# Altium PCB iMX6 Rex Development Baseboard V1I1_PCB.PcbDoc (part 6 of 6)
Units mm, origin at the board's own origin, x right, y up, seen from the top; angles counter-clockwise.
Board outline 135 x 110 mm, 6 copper layers (L1, L2, L3, L4 (PWR), L5, L6), stack 1.542 mm thick; 580 components, 458 nets, 2100 pads, 1201 vias.
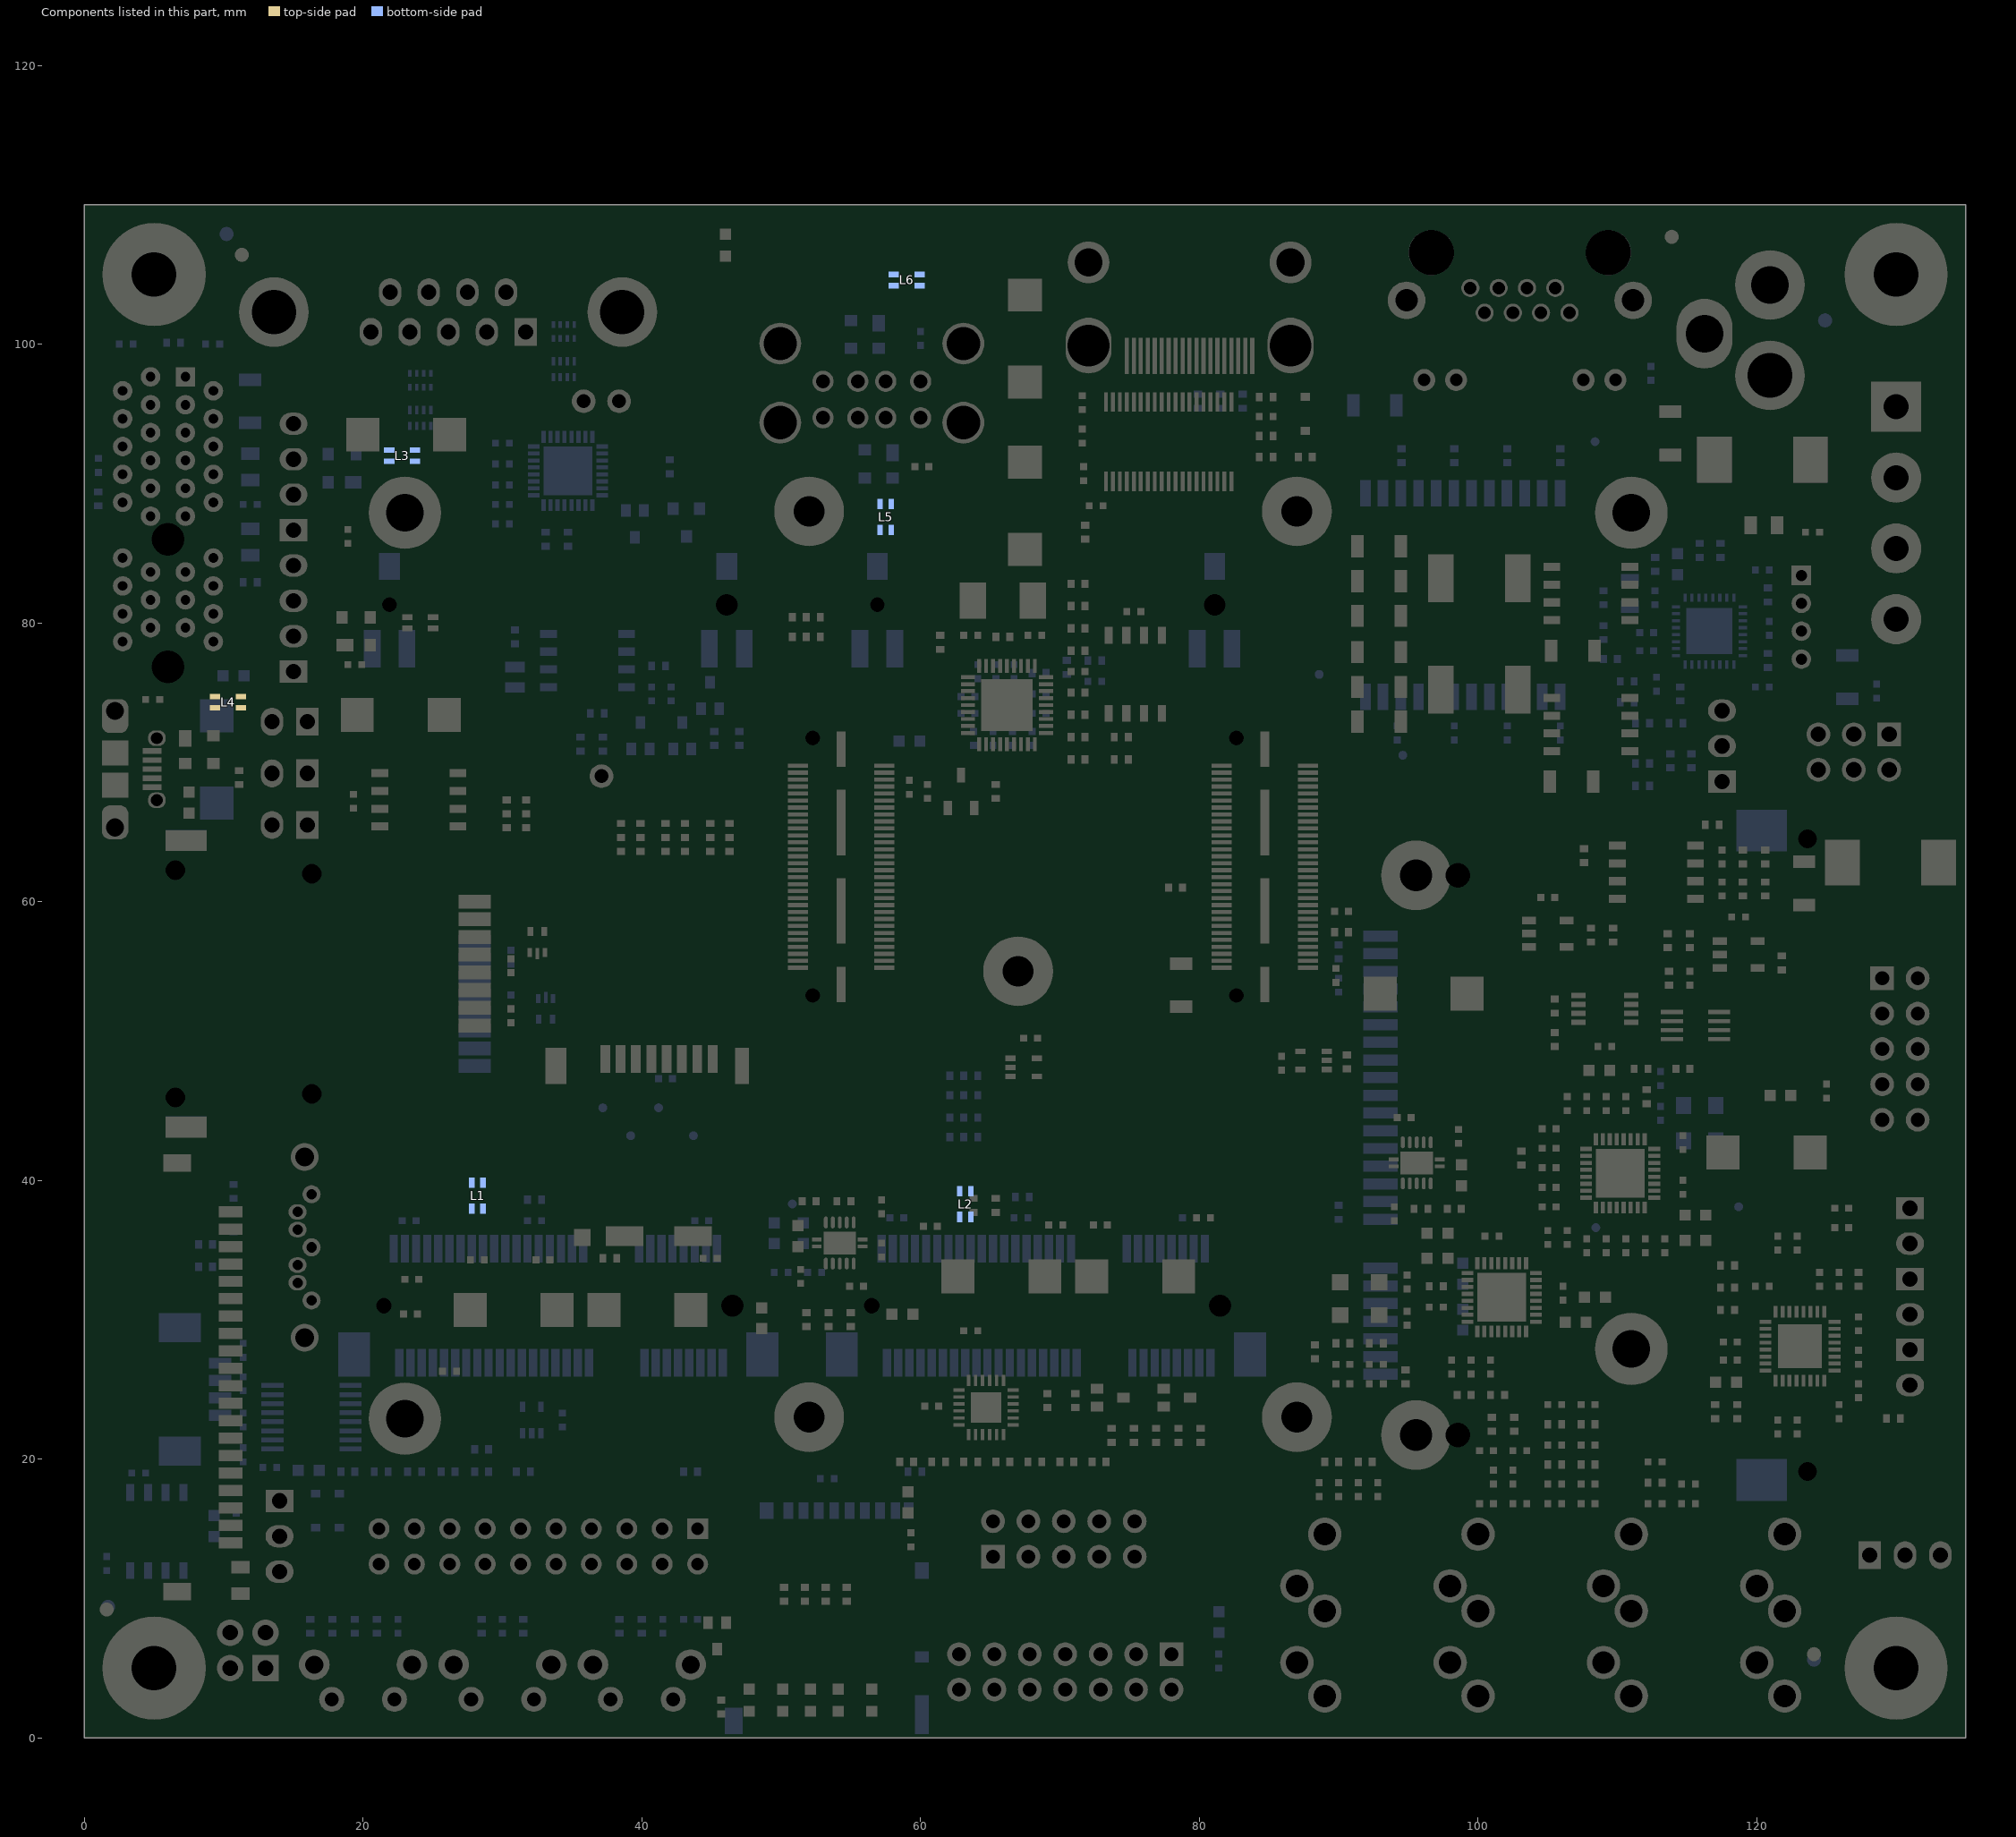
[diagram p10: the components of this part, seen from the top]

## Polygon pours and split planes (outlines as drawn) (continued)
GND on L6 "L6-No Net" (solid, pour order 292): 44.2,76.8 45.5,76.8 46,77.2 46,79.1 45.6,79.5 44.2,79.5
GND on L6 "L6-No Net" (solid, pour order 294): 46.7,79.5 48.3,79.5 48.7,79.1 48.7,77.2 48.3,76.8 46.7,76.8
GND on L6 "L6-No Net" (solid, pour order 306): 45.9,0.3 47.5,0.3 47.9,0.7 47.9,1.2 47.9,1.6 47.3,2.2 46,2.2 45.9,2.2 45.6,1.9 45.3,1.6 45.3,0.8 45.3,0.7 45.4,0.6 45.7,0.3 45.9,0.3
+5V_VCC1 on L6 "L6-No Net" (solid, pour order 224): 17 vertices, not listed, extent 107.9,68 111.6,79.1
GND on L6 "L6-No Net" (solid, pour order 303): 5.6,65.16 5.3,64.86 5.3,63.86 5.6,63.56 8.8,63.56 8.8,65.16 8.7,65.16
GND on L6 "L6-No Net" (solid, pour order 253): 8.3,27.9 8,27.6 4.9,27.6 3.4,29.1 3.4,30.3 3.7,30.6 8.3,30.6
GND on L6 "L6-No Net" (solid, pour order 212): 17.4,18.2 17.5,18.3 17.5,18.7 17.3,18.9 17.3,19.6 16.4,19.6 16.4,18.3 16.5,18.2
GND on L6 "L6-No Net" (solid, pour order 217): 18.2,25.9 20.5,25.9 21.1,26.5 21.1,28.5 20.5,29.1 18.2,29.1
GND on L6 "L6-No Net" (solid, pour order 223): 55.5,25.9 55.5,29.1 53.2,29.1 52.6,28.5 52.6,28 52.6,26.5 53.2,25.9 55.5,25.9
GND on L6 "L6-No Net" (solid, pour order 227): 81.9,8.6 81.9,9.7 81.5,10.1 81,10.1 80.2,9.3 80.2,8.8 80.4,8.6
GND on L6 "L6-No Net" (solid, pour order 236): 122.2,66.6 122.2,63.5 122,63.3 121.7,63 120,63 118.5,63 118.1,63.4 118,63.5 118,64.8 118,66.1 118.5,66.6 122.2,66.6
GND on L6 "L6-No Net" (solid, pour order 242): 125.7,78.1 125.8,78.2 128,78.2 128.1,78.1 128.1,76.9 128,76.8 127.7,76.8 127.3,77.2 125.7,77.2
+12V_ATX on L6 "L6-No Net" (solid, pour order 286): 122.6,90 122.8,89.8 126.3,89.8 129.2,92.7 130.1,93.6 131.8,93.6 131.8,97.3 126.5,97.3 122.6,93.4
+5V_USBDN1_VBUS on L6 "L6-No Net" (solid, pour order 275): 19 vertices, not listed, extent 56.6,96.5 60.8,102.1
+VIN on L6 "L6-No Net" (solid, pour order 315): 20 vertices, not listed, extent 111.8,86.7 118.3,93.4
+3V3 on L6 "L6-No Net" (solid, pour order 230): 77.1,5.1 80.1,5.1 80.7,5.7 81.6,5.7 81.9,6 81.9,8 78.2,8 77.1,6.9
GND on L6 "L6-No Net" (solid, pour order 317): 60.6,0.3 60.6,3.1 59.6,3.1 58.9,2.4 58.9,0.6 59.2,0.3
GND on L6 "L6-No Net" (solid, pour order 321): 59.6,12.6 60.9,12.6 61.2,12.3 61.2,12 61.2,11.7 60.9,11.4 59.6,11.4 59.6,12.6
GND on L6 "L6-No Net" (solid, pour order 323): 8.3,68.3 10.7,68.3 10.7,63.6 10.3,63.2 9.5,63.2 9.1,63.6 9.1,64 9.1,65.1 8.3,65.9 8.3,68.3
+1V5_MPCIE1 on L6 "L6-No Net" (solid, pour order 240): 38 vertices, not listed, extent 23.5,30.4 49.9,37.4
+5V on L6 "L6-No Net" (solid, pour order 328): 11,75.8 11.9,75.8 12.3,76.2 12.3,78.6 11.4,79.5 10.7,79.5 10.5,79.3 10.5,77.5 11,77
GND on L6 "L6-No Net" (solid, pour order 220): 47.5,25.9 49.8,25.9 50.4,26.5 50.4,29.6 50.2,29.8 48.2,29.8 47.5,29.1
+5V_USB1_VBUS on L6 "L6-No Net" (solid, pour order 331): 18.7,90.5 19.9,90.5 19.9,88.7 19.5,88.3 19.4,88.2 19,88.2 18.9,88.2 18.7,88.4 18.7,90.6
GND on L6 "L6-No Net" (solid, pour order 297): 21.3,79.5 21.3,76.6 20.8,76.1 19.8,76.1 19.7,76.2 19.7,76.7 20,77 20,79.5
GND on L6 "L6-No Net" (solid, pour order 243): 8.9,15.5 9.7,15.5 9.9,15.7 9.9,16.8 9.7,17 8.5,17 8.4,16.9 8.4,16
+1V5_MPCIE2 on L6 "L6-No Net" (solid, pour order 239): 38 vertices, not listed, extent 51.2,30.6 79.1,37.6
+3V3_MPCIE1 on L1 "L6-No Net" (solid, pour order 332): 63 vertices, not listed, extent 22,24.4 49.1,35.7
GND on L1 "L6-No Net" (solid, pour order 301): 5.5,44.6 5.3,44.4 5.3,43.2 5.5,43 8.8,43 8.8,44.6
GND on L1 "L6-No Net" (solid, pour order 320): 29.8,51.9 30,52.1 30,52.5 29.6,52.9 26.6,52.9 25.9,52.2 25.9,51.8 26.1,51.6 26.5,51.6 26.8,51.9
+VIN on L1 "L6-No Net" (solid, pour order 310): 47 vertices, not listed, extent 104.7,67.2 118.7,93.4
+MPCIE2_SIM_PWR on L1 "L6-No Net" (solid, pour order 206): 32.9,56.7 32.9,55.3 33.4,55.3 34,55.9 34.4,56.3 34.4,56.7 34.1,57 33.2,57
+5V_AUDIO1 on L1 "L6-No Net" (solid, pour order 213): 124.1,38.2 125,39.1 125,44.4 123.4,46 122.9,46.5 122,46.5 122,44.5 122.6,43.9 122.6,40 121.7,39.1 121.7,38.4 121.9,38.2
+5V on L1 "L6-No Net" (solid, pour order 186): 21 vertices, not listed, extent 121,76.7 126.2,87.7
+5V on L1 "L6-No Net" (solid, pour order 259): 94,79.7 98.9,79.7 100.2,81 100.2,85.5 99,86.7 97,86.7 95.8,87.9 94,87.9
+3V3 on L1 "L6-No Net" (solid, pour order 189): 124.7,46.2 128.2,46.2 128.4,46 131.4,46 132.4,45 132.4,44 131.9,43.5 131.4,43 127.4,43 124.7,45.7
+3V3 on L1 "L6-No Net" (solid, pour order 168): 22 vertices, not listed, extent 1.7,87.3 23.2,99.1
GND on L1 "L6-No Net" (solid, pour order 201): 93.6,42.1 97.1,42.1 97.9,42.9 99.2,42.9 99.2,41.7 99.4,41.5 99.6,41.5 99.7,41.4 99.8,41.3 99.8,40.9 99.6,40.7 98.1,40.7 97.8,40.4 93.6,40.4
+5V on L1 "L6-No Net" (solid, pour order 330): 122.4,61.1 127.4,61.1 127.4,64.5 124.9,64.5 123.7,63.3 122.6,63.3 122.2,62.9 122.2,61.3
GND on L1 "L6-No Net" (solid, pour order 327): 98.1,54.7 100.5,54.7 100.5,50.6 100.2,50.3 98.2,50.3 97.9,50.6 97.9,54.5 97.9,54.7 98.1,54.7
GND on L1 "L6-No Net" (solid, pour order 326): 122.6,60.2 124.2,60.2 124.8,59.6 124.8,58.3 124.5,58 122.4,58 122.1,58.3 122.1,59.7
GND on L1 "L6-No Net" (solid, pour order 322): 77.9,52.9 77.9,51.8 78.3,51.4 80.6,51.4 80.7,51.5 80.7,52.7 80.5,52.9
GND on L1 "L6-No Net" (solid, pour order 179): 18.2,67.5 18.3,67.4 20.5,67.4 20.7,67.6 21.8,67.6 21.8,68.3 20.7,68.3 20.4,68.6 18.3,68.6 18.2,68.5
GND on L1 "L6-No Net" (solid, pour order 181): 25,94.8 28.3,94.8 28.6,94.5 28.6,91.1 26,91.1 25,92.1
+5V_USB_OTG on L1 "L6-No Net" (solid, pour order 176): 5.9,70.6 6.7,70.6 7.2,71.1 7.7,71.1 7.7,72.3 6.8,73.2 6.8,75 6.6,75.2 5.1,75.2 5.1,72.8 5.9,72
+VIN on L1 "L6-No Net" (solid, pour order 199): 77.9,54.5 78.4,54 81.3,54 82.4,55.1 82.4,56.4 79.9,56.4 79.1,57.2 78.4,57.2 77.9,56.7
+3V3 on L1 "L6-No Net" (solid, pour order 200): 96.1,42.3 96.7,42.3 97.5,43.1 97.8,43.1 98.1,43.4 98.9,43.4 99.3,43.8 99.3,44.5 99.2,44.6 98,44.6 97.3,43.9 96.8,43.9 96,43.1 96,42.4
+1V8_AUDIO2 on L1 "L6-No Net" (solid, pour order 203): 96,40.1 96.1,40.2 98,40.2 98.1,40.1 100.2,40.1 100.5,39.8 100.5,37.8 100.3,37.6 98.5,37.6 98.5,38.3 98.1,38.7 96.5,38.7 96,39.2
+AUD2_DVDD on L1 "L6-No Net" (solid, pour order 209): 114.4,37.1 115.3,37.1 115.3,38.3 115.3,38.4 115,38.7 115,39.2 115,39.3 114.2,39.3 114.1,39.4 113.8,39.4 113.7,39.4 113.7,39.1 113.9,38.9 114.4,38.4 114.4,37.1
AMP_PVSS on L1 "L6-No Net" (solid, pour order 210): 126.3,29 126.3,28.2 126.7,28.2 126.8,28.2 127.5,28.9 127.6,29 127.6,29.4 127.6,29.5 127,29.5 126.7,29.2 126.5,29 126.3,29
+5V_AUDIO1 on L1 "L6-No Net" (solid, pour order 211): 118.1,25.1 119.1,25.1 119.1,26.7 119.4,27 119.4,27.5 118.4,27.5 118.3,27.4 118.3,26.8 118.1,26.6
+5V on L1 "L6-No Net" (solid, pour order 215): 120.5,45.7 121.4,45.7 121.4,46.7 122.3,47.6 122.8,47.6 123.1,47.9 123.1,48.4 122.9,48.6 120.7,48.6 120.5,48.4
GND on L1 "L6-No Net" (solid, pour order 216): 116.4,40.8 120,40.8 120.2,41 120.2,43 120,43.2 116.4,43.2
GND on L1 "L6-No Net" (solid, pour order 229): 52,35.7 52.1,35.8 52.1,36.3 56.2,36.3 56.2,34.7 52.7,34.7 52.3,34.3 52.3,33.5 52.2,33.4 50.7,33.4 50.1,34 50.1,35.3 50.5,35.7
+3V3 on L1 "L6-No Net" (solid, pour order 228): 52.4,31.5 53.8,32.9 53.8,34.4 53.7,34.5 53.2,34.5 53.1,34.4 53.1,33.8 52.2,32.9 51,32.9 50.8,32.7 50.8,31.6 50.9,31.5
+1V5 on L1 "L6-No Net" (solid, pour order 231): 51.6,36.3 51.9,36.6 53.1,36.6 53.2,36.5 53.7,36.5 53.8,36.6 53.8,37.3 53.4,37.7 52.3,37.7 51.8,38.2 51.8,38.8 51,38.8 50.1,37.9 50.1,36.5 50.3,36.3
GND on L1 "L6-No Net" (solid, pour order 232): 36.1,31.9 38.5,31.9 38.5,29 38.4,28.9 36.2,28.9 36.1,29 36.1,31.9
GND on L1 "L6-No Net" (solid, pour order 234): 32.6,28.9 35,28.9 35.1,29 35.1,31.9 32.5,31.9 32.5,29
+3V3 on L1 "L6-No Net" (solid, pour order 237): 20 vertices, not listed, extent 57.1,30 59.7,32.2
GND on L1 "L6-No Net" (solid, pour order 241): 10.5,10.8 11.9,10.8 11.9,9.3 11.7,9.1 10.7,9.1 10.5,9.3 10.5,10.8
+VDD_LVDS on L1 "L6-No Net" (solid, pour order 246): 10.5,11.8 11.9,11.8 11.9,12.7 11.9,13 12.6,13.7 12.6,15.5 12.4,15.7 11.8,15.7 10.5,15.7 10.5,11.8
GND on L1 "L6-No Net" (solid, pour order 258): 91.8,72.1 91.8,78.7 89.8,78.7 89.5,78.7 89.3,78.5 89.2,78.4 89.2,75.3 89.2,72.4 89.5,72.1 91.8,72.1
GND on L1 "L6-No Net" (solid, pour order 256): 91.8,79.7 91.8,86.3 89.8,86.3 89.5,86.3 89.3,86.1 89.2,86 89.2,82.9 89.2,80 89.5,79.7 91.8,79.7
PHASE1_5V on L1 "L6-No Net" (solid, pour order 264): 105.3,84.3 104.6,85 101.9,85 101.9,81.4 102.1,81.2 105.3,81.2
GND on L1 "L6-No Net" (solid, pour order 265): 113,94.7 115.3,94.7 115.8,95.2 115.8,97.2 115.5,97.5 113.3,97.5 113,97.2
+5V_USBDN2_VBUS on L1 "L6-No Net" (solid, pour order 271): 26 vertices, not listed, extent 59.2,89.1 68.8,95.5
GND on L1 "L6-No Net" (solid, pour order 282): 24.6,72.2 27,72.2 27,76.4 26.6,76.8 24.7,76.8 24.3,76.4 24.3,75 24.6,74.6
GND on L1 "L6-No Net" (solid, pour order 285): 66.2,84.1 68.8,84.1 68.8,87 68.8,87.4 68.5,87.7 68.4,87.7 66.6,87.7 66.5,87.7 66.2,87.4 66.2,84.1
GND on L1 "L6-No Net" (solid, pour order 283): 66.2,102.34 68.8,102.34 68.8,105.24 68.8,105.64 68.5,105.94 68.4,105.94 66.6,105.94 66.5,105.94 66.2,105.64 66.2,102.34
GND on L1 "L6-No Net" (solid, pour order 247): 3,42.75 2.5,42.25 2.5,41.05 3,40.55 8.8,40.55 9.3,41.05 9.3,42.25 8.8,42.75
+VIN on L1 "L6-No Net" (solid, pour order 197): 17 vertices, not listed, extent 85.7,51.4 90.1,55.9
GND on L1 "L6-No Net" (solid, pour order 307): 105.6,69.4 105.6,67.8 106.1,67.3 106.1,66.7 105.9,66.5 103.9,66.5 103.6,66.8 103.6,67.6 104.5,68.5 104.5,69.4
GND on L1 "L6-No Net" (solid, pour order 309): 103.5,79.9 104.2,79.9 104.3,79.8 105.3,78.8 105.7,78.8 105.7,77.2 104.8,77.2 104.6,77.4 103.7,77.4 103.4,77.7 103.4,79.6 103.4,79.7 103.6,79.9
GND on L1 "L6-No Net" (solid, pour order 314): 17 vertices, not listed, extent 105.2,80.8 110.9,88.1
PHASE2_3V3 on L1 "L6-No Net" (solid, pour order 262): 105.3,75.8 104.1,77 101.9,77 101.9,73.5 103.7,71.7 105.3,71.7
+VIN on L1 "L6-No Net" (solid, pour order 312): 104.5,87 106,88.5 107.3,88.5 109.6,90.8 112.7,90.8 112.7,93.2 112.5,93.4 108.8,93.4 105.5,90.1 99.4,90.1 97.3,88 97.3,87.3 97.6,87
GND on L1 "L6-No Net" (solid, pour order 300): 5.6,65.15 5.3,64.85 5.3,63.85 5.6,63.55 8.8,63.55 8.8,65.15 8.7,65.15
GND on L1 "L6-No Net" (solid, pour order 318): 47.7,46.9 47.7,49.5 46.7,49.5 46.1,48.9 46,48.8 46,48.2 46,47.2 46.3,46.9 47.7,46.9
+V_INPUT on L1 "L6-No Net" (solid, pour order 180): 125.1,90 125.1,97.4 122.2,100.3 119.9,100.3 118.4,98.8 118.4,97.2 120.4,95.2 121.2,94.4 122,93.6 122.6,93 122.6,90
GND on L1 "L6-No Net" (solid, pour order 183): 119.1,86.3 120,86.3 120,87.7 120.3,88 120.3,88.2 120.3,88.3 120.2,88.4 118.8,88.4 118.7,88.3 118.7,88.1 119.1,87.7
GND on L1 "L6-No Net" (solid, pour order 313): 17 vertices, not listed, extent 105.2,70.1 110.9,76.9
GND on L1 "L6-No Net" (solid, pour order 195): 76.3,81.4 76,81.7 75.7,81.7 75.5,81.5 75.5,79.9 75.7,79.7 75.7,77.4 76.3,77.4
GND on L1 "L6-No Net" (solid, pour order 202): 71.1,34.3 73.5,34.3 73.5,31.9 73.8,31.6 73.8,31.4 73.7,31.3 71.3,31.3 71.1,31.5
GND on L1 "L6-No Net" (solid, pour order 198): 67.7,34.3 70.1,34.3 70.4,34 70.4,31.8 70.6,31.6 70.6,31.4 70.5,31.3 68,31.3 67.7,31.6
+3V3 on L1 "L6-No Net" (solid, pour order 205): 66.1,13.9 66.1,12.1 63.2,12.1 60.9,14.4 59.1,14.4 58.7,14.8 58.7,16.6 59.7,16.6 60.3,16 61.6,16 63.7,13.9
GND on L1 "L6-No Net" (solid, pour order 208): 60.3,17.2 60.4,17.3 60.4,17.6 59.4,18.6 58.9,18.6 58.7,18.4 58.7,17.2
GND on L1 "L6-No Net" (solid, pour order 214): 34.6,49.5 34.6,46.9 34.2,46.5 32.6,46.5 32.5,46.6 32.5,49 33,49.5
+5V_USBDN1_VBUS on L1 "L6-No Net" (solid, pour order 270): 66.6,93.5 67,93.1 68.8,93.1 69.2,93.5 69.2,98 68.7,98.5 60.1,98.5 59.2,97.6 59.2,97 60.1,96.1 65.4,96.1 66.6,94.9
+1V8_AUDIO2 on L1 "L6-No Net" (solid, pour order 207): 115.9,37.9 116.3,38.3 117.3,38.3 117.5,38.1 117.5,36.9 117.4,36.8 116.1,36.8 115.9,37
GND on L1 "L6-No Net" (solid, pour order 316): 42.3,35.3 46.4,35.3 46.4,36.5 46.3,36.6 45.1,36.6 45,36.7 42.3,36.7
GND on L1 "L6-No Net" (solid, pour order 319): 35.1,35.3 36.3,35.3 36.6,35.3 36.9,35.6 36.9,36.2 36.6,36.5 35.1,36.5 35.1,35.3
+3V3 on L1 "L6-No Net" (solid, pour order 325): 91.2,52.2 94.2,52.2 94.2,54.6 91.8,54.6 91,53.8 91,52.4
+5V on L1 "L6-No Net" (solid, pour order 226): 90.4,57.4 91.1,57.4 92.5,56 97.8,56 98.7,56.9 98.7,57.4 98.5,57.6 93.8,57.6 93.2,58.2 90.4,58.2
+5V_ATX on L1 "L6-No Net" (solid, pour order 329): 131.8,61.1 134.3,61.1 134.3,64.9 133.5,65.7 133.5,79.8 131.3,82 129,82 127.9,80.9 127.9,78.5 131,75.4 131,65.2 131.8,64.4
+3V3 on L1 "L6-No Net" (solid, pour order 235): 48.1,30.4 49,30.4 49.9,31.2 49.9,32.5 49.6,32.8 47.6,32.8 47.3,32.5 47.3,31.6 47.7,31.2 47.7,30.8
+5V_USB1_VBUS on L1 "L6-No Net" (solid, pour order 182): 17 vertices, not listed, extent 13.9,85.8 21.2,95.3
+3V3 on L1 "L6-No Net" (solid, pour order 261): 94,71.6 94.6,71 95.5,71 96.6,72.1 99.3,72.1 100.2,73 100.2,77.5 99,78.7 94,78.7
+5V_USBDN3_VBUS on L1 "L6-No Net" (solid, pour order 280): 18.2,70 20.1,70 20.8,70.7 20.8,74.6 19.1,76.3 19.1,77.7 19.3,77.9 19.3,78.8 17.8,78.8 16.3,77.3 14,77.3 14,75.7 16,75.7 17.8,73.9 17.8,70.3
+3V3_MPCIE2 on L1 "L6-No Net" (solid, pour order 196): 60 vertices, not listed, extent 56.2,28.2 81.6,37.6
GND on L1 "L6-No Net" (solid, pour order 248): 3.9,9 3.3,9.6 3.3,10.7 3.8,11.2 8.8,11.2 9.3,10.7 9.3,9.5 8.8,9
+MPCIE1_SIM_VPP on L4 (PWR) "L6-No Net" (solid, pour order 260): 36,32.5 40.5,32.5 40.5,36.3 43.5,39.3 43.5,48.5 42,50 35.5,50 33.5,52 33.5,53.5 28.5,53.5 28.5,48.1 41.1,48.1 41.1,43.9 36,38.8
+MPCIE1_SIM_PWR on L4 (PWR) "L6-No Net" (solid, pour order 263): 41,32.5 43.5,32.5 44.5,33.5 47.1,36.1 49,36.1 49,48.3 43.8,53.5 34,53.5 34,52.2 35.7,50.5 42.2,50.5 44,48.7 44,39.1 41,36.1
+3V3 on L4 (PWR) "L6-No Net" (solid, pour order 302): 101 vertices, not listed, extent 1,1 134,96.6
+MPCIE2_SIM_PWR on L4 (PWR) "L6-No Net" (solid, pour order 269): 21 vertices, not listed, extent 30.5,36 80.1,61.5
+VIN on L4 (PWR) "L6-No Net" (solid, pour order 299): 36 vertices, not listed, extent 107,65 122.5,87.5
+5V on L4 (PWR) "L6-No Net" (solid, pour order 296): 91 vertices, not listed, extent 1,14 134,103.5
+5V_USBDN1_VBUS on L4 (PWR) "L6-No Net" (solid, pour order 287): 73.5,80.5 63,80.5 63,94.1 69.5,94.1 69.5,91.5 65.5,91.5 65.5,87.8 66.3,87 68.3,87 72.3,83 73.5,83
+1V5 on L4 (PWR) "L6-No Net" (solid, pour order 290): 18 vertices, not listed, extent 49.5,33 90.5,43.502
+1V8_AUDIO2 on L4 (PWR) "L6-No Net" (solid, pour order 254): 20 vertices, not listed, extent 86.5,1 134,52
+5V_USB1_VBUS on L4 (PWR) "L6-No Net" (solid, pour order 281): 18 vertices, not listed, extent 15.5,68.5 23.5,95.7
+VIN on L4 (PWR) "L6-No Net" (solid, pour order 293): 81,51 87,51 87,54 84.5,56.5 84.5,70.3 93.5,79.3 93.5,86 101.5,86 101.5,89.5 88.2,89.5 76.7,78 76.7,55.3
+5V_USBDN2_VBUS on L4 (PWR) "L6-No Net" (solid, pour order 284): 75,83.5 72.5,83.5 72,84 68.5,87.5 66.5,87.5 66,88 66,91 70,91 75,86
+3V3_USB_HUB on L4 (PWR) "L6-No Net" (solid, pour order 193): 59,70 76.2,70 76.2,75 72,75 72,80 63,80 63,77.5 59,77.5
+12V_ATX on L4 (PWR) "L6-No Net" (solid, pour order 257): 18 vertices, not listed, extent 1,87 134,109
+VBAT on L4 (PWR) "L6-No Net" (solid, pour order 272): 24 vertices, not listed, extent 16,16 43,89.5
+5V_USBDN3_VBUS on L4 (PWR) "L6-No Net" (solid, pour order 278): 22.5,64.5 19.7,64.5 18.7,65.5 16.5,65.5 16.5,71.5 20.5,71.5 20.5,69.5 22,68 23.5,68 23.5,65.5
+5V_AUDIO1 on L4 (PWR) "L6-No Net" (solid, pour order 249): 134,21 134,40 119.5,40 119.5,36 117,33.5 117,22.7 118.7,21
+MPCIE2_SIM_VPP on L4 (PWR) "L6-No Net" (solid, pour order 266): 21 vertices, not listed, extent 28.5,36 76,57.5
+VDD_LVDS_SW on L3 "L6-No Net" (solid, pour order 305): 15,11 11,11 2.5,19.5 2.5,23 5.5,23 5.5,21.5 9.5,17.5 15,17.5
+12V_ATX on L3 "L6-No Net" (solid, pour order 308): 116.5,69 121.5,69 127,74.5 127,87 123.5,90.5 123.5,98.5 134,98.5 134,65 116.5,65
+3V3 on L3 "L6-No Net" (solid, pour order 311): 35 vertices, not listed, extent 71.5,60.5 126.5,99.9
GND on L2 (split plane): 134.498,0.502 0.502,0.502 0.502,109.498 134.498,109.498
GND on L5 (split plane): 134.498,0.502 0.502,0.502 0.502,109.498 134.498,109.498

## Other copper
L6:
  text "(c) FEDEVEL 2013" at 71.3,103.7 h1.05 r180
  text "MM" at 120.6,86.3 h1

## Silkscreen, mask and mechanical layers (free items; w line width, h text height)
Top Overlay:
  lines w0.2: 45.2,81.8 45.2,95.5 ; 28.9,60.8 28.9,68.1 33.1,68.1 33.1,60.8 28.9,60.8 ; 28.9,60.8 28.9,60.8 ; 37.3,60.8 47.5,60.8 47.5,66.7 37.3,66.7 37.3,60.8 ; 49.5,77.7 49.5,85.1 54.1,85.1 54.1,77.7 49.5,77.7
  text "ACT" at 47.7,104.9 h1.3 r180
  text "HUB" at 47.7,103 h1.3 r180
  text "USB" at 47.7,101.1 h1.3 r180
  text "INPUT: +7V-24V DC" at 112,95.3 h1.4 r180
  text "POSITIVE IN CENTER" at 111.8,93.1 h1.3 r180
  text "SEL" at 53,84.4 h1 r180
  text "USB0" at 53.6,82.9 h1 r180
  text "SEL" at 32.3,64.1 h1 r180
  text "USB1" at 32.6,62.5 h1 r180
  text "PCIE_SEL" at 46.1,62.4 h1 r180
  text "SIM2" at 29.8,49.2 h1.3 r270
  text "LVDS" at 10.3,43.7 h1.3 r270
  text "FEDEVEL Academy" at 2.3,39.1 h1.8 r270
  text "www.iMX6Rex.com" at 0.5,33.9 h1.3 r270
  text "SATA" at 13.4,24.6 h1.3
  text "MODEM" at 55.9,11.2 h1.3 r270
  text "PAN" at 49.4,8.6 h1.3 r270
  text "LAN" at 51.5,8.6 h1.3 r270
  text "WAN" at 53.5,8.6 h1.3 r270
  text "ON/OFF" at 26.3,7.4 h1.3
  text "RESET" at 17.1,7.3 h1.3
  text "USER" at 37.6,7.3 h1.3
  text "SD" at 47.1,7.2 h1.3 r270
Bottom Overlay:
  lines w0.2: 122.5,16 131.4,16 ; 131.4,39 131.4,43.24 ; 131.4,55.6 131.4,67.6 ; 59.2,40.9 65.2,40.9 65.2,49.6 59.2,49.6 59.2,40.9
  lines w0.254: 86.2,31.2 88.7,31.2 ; 86.2,34.2 88.7,34.2 ; 86.2,37.2 88.7,37.2 ; 86.2,40.2 88.7,40.2 ; 86.2,43.2 88.7,43.2 ; 86.2,28.2 88.7,28.2 88.7,46.2 86.2,46.2 86.2,28.2
  text "COM1 (RS232)" at 19.1,109.2 h1.3 r180
  text "2x USB(HUB)" at 50.3,109.2 h1.3 r180
  text "HDMI" at 77.3,109.2 h1.3 r180
  text "ETHERNET" at 98,109.2 h1.3 r180
  text "INPUT_POWER" at 112,109.2 h1.3 r180
  text "USB1" at 14.4,96.1 h1 r270
  text "+5V" at 106.7,94.9 h1 r180
  text "PCIE" at 0.5,94.2 h1.3 r270
  text "ATX_POWER" at 134.3,93.5 h1.3 r90
  text "GND" at 85.2,76.8 h1 r180
  text "USB(HUB)" at 16.9,76.7 h1 r270
  text "BACKLIGHT" at 134.3,76.7 h1.3 r90
  text "BAT+" at 27.7,74.9 h1 r270
  text "5/12V" at 122.6,74.2 h1.3 r90
  text "BKL" at 120.4,72.9 h1.3 r90
  text "USB0_ID" at 26.1,72 h1.3
  text "+3V3" at 92.2,69.7 h1 r180
  text "PCIE MINI 2 (USB + VOICE)" at 71.5,69 h1.3 r90
  text "BOOT_MODE" at 28.9,68.4 h1.3
  text "OTG" at 0.6,68.2 h1 r270
  text "USB0" at 2.5,67.7 h1 r270
  text "PCIE MINI 1 (PCIE + USB)" at 36.5,67 h1.3 r90
  text "SD2_WP" at 25,64.7 h1.3
  text "COM2 (CMOS)" at 134.3,56.1 h1.3 r90
  text "MODBOX" at 88.1,54.4 h1.3 r90
  text "SATA_SEL" at 60.8,49.1 h1 r90
  text "A" at 88.2,45.2 h1.52 r90
  text "B" at 88.2,42.2 h1.52 r90
  text "+1V8" at 120.4,40.2 h1 r90
  text "MIC2" at 134.3,39.8 h1.3 r90
  text "SIM1" at 0.7,39.5 h1.3 r270
  text "C" at 88.2,39.2 h1.52 r90
  text "+1V5" at 53,39.1 h1
  text "D" at 88.2,36.2 h1.52 r90
  text "E" at 88.2,33.2 h1.52 r90
  text "SPEAKERS2" at 134.3,32.5 h1.3 r90
  text "F" at 88.2,30.2 h1.52 r90
  text "iMX6 Rex DBB V1I1" at 83.7,21.9 h1.8
  text "TOUCHSCREEN" at 0.7,17.6 h1.3 r270
  text "GPIO_HEADER" at 77,17.1 h1.3
  text "JTAG" at 35,16.7 h1.3
  text "HEADPHONES1" at 84.5,14.5 h1.3 r90
  text "MICROPHONE1" at 117.5,14 h1.3 r90
  text "LINE_OUT1" at 95.5,11.5 h1.3 r90
  text "LINE_IN2" at 134.1,10.2 h1.3
  text "LINE_IN1" at 106.5,10 h1.3 r90
  text "LVDS_3/5V" at 19.7,9.5 h1.3
  text "PWR_RED" at 15.6,2.4 h1
  text "USR_GRN" at 15.6,0.7 h1
  text "SYSTEM_HEADER" at 78.6,0.7 h1.3
Bottom Solder:
  text "(c) FEDEVEL 2013" at 71.3,103.7 h1.05 r180
Mechanical Drawing:
  circle w1: c35.83,95.9 r0.35
  circle w1: c38.37,95.9 r0.35
  circle w1: c37.1,69 r0.35
  circle w1: c111,87.9 r1.35
  circle w1: c111,27.9 r1.35
  circle w1: c23,22.9 r1.35
  circle w1: c23,87.9 r1.35
  circle w0.6: c130,5 r1.6
  circle w0.6: c5,5 r1.6
  circle w0.6: c5,105 r1.6
  circle w0.35: c87,23 r1.1
  circle w0.35: c52,23 r1.1
  circle w0.35: c52,88 r1.1
  circle w0.35: c87,88 r1.1
  circle w0.6: c130,105 r1.6
  lines w0.2: 0,5 5,5 5,0
  lines w0.35: 49.5,20.5 49.5,90.5 89.5,90.5 89.5,20.5 49.5,20.5
  lines w1: 0,0 135,0 135,110 0,110 0,0 ; 19,19 115,19 115,92 91,92 19,92 19,19
  text "Mechanical Drawing of iMX6 Rex Development Baseboard" at 141.5,149.5 h3.5 r270
  text "Suggested heatsink dimensions" at 118,83.5 h2 r270
  text "Module dimensions" at 91,66 h1.5 r270
  text ".VersionRevision" at 141.5,-31.5 h3.5 r270
Manufacturing Notes:
  lines w0.254: 2.5,-42.5 95,-42.5 ; 2.5,-42.425 2.5,-32.425 ; 2.5,-22.5 95,-22.5 ; 42.5,-32.5 42.5,-22.5 ; 77.5,-22.5 77.5,-15 ; 95,-42.425 95,-32.425 ; 2.5,-32.5 2.5,-15 95,-15 95,-32.5 2.5,-32.5
  lines w0.4: 231.524,56.2 380.976,56.2 ; 231.524,63.16 380.976,63.16 ; 380,72.5 232.25,72.5 ccw(c232.25,70.25) 230,70.25 230,-7.75 ccw(c232.25,-7.75) 232.25,-10 380.25,-10 ccw(c380.25,-7.75) 382.5,-7.75 382.5,70.25 ccw(c380.25,70.25) 380.25,72.5
  text "Files" at -47.5,195 h1.52
  text "*.GTO - Top Overlay" at -47.5,192.5 h1.52
  text "*.GTP - Top Paste" at -47.5,190 h1.52
  text "*.GTS - Top Solder" at -47.5,187.5 h1.52
  text "*.GTL - L1 (Positive)" at -47.5,185 h1.52
  text "*.GP1 - L2 (Negative)" at -47.5,182.5 h1.52
  text "*.G1 - L3 (Positive)" at -47.5,180 h1.52
  text "*.G2 - L4 (Positive)" at -47.5,177.5 h1.52
  text "*.GP2 - L5 (Negative)" at -47.5,175 h1.52
  text "*.GBL - L6 (Positive)" at -47.5,172.5 h1.52
  text "*.GBS - Bottom Solder" at -47.5,170 h1.52
  text "*.GBP - Bottom Paste" at -47.5,167.5 h1.52
  text "*.GBO - Bottom Overlay" at -47.5,165 h1.52
  text "*.GM2 - Mechanical Drawing" at -47.5,162.5 h1.52
  text "*.GM3 - Manufacturing Notes" at -47.5,160 h1.52
  text "Board info" at 230,160 h1.52
  text "*.GM4 - Licence" at -47.5,157.5 h1.52
  text "Minimum Track: 200um" at 230,157.5 h1.52
  text "*.GM28 - Board Outline" at -47.5,155 h1.52
  text "Minimum Gap: 150um" at 230,155 h1.52
  text "Minimum Through Hole VIA: 0.45mm (pad) / 0.2mm (drill). Drilling: L1-L6" at 230,152.5 h1.52
  text "1. REMOVE ALL NON-FUNCTIONAL INNER LAYER PADS." at 230,147.5 h1.52
  text "2. THIS BOARD CONTAINS IMPEDANCE CONTROLLED TRACKS, TRACK AND GAP SIZES ARE AS FOLLOWS:" at 230,142.5 h1.52
  text "TYPE;" at 235,137.5 h1.52
  text "Impedance;" at 247.5,137.5 h1.52
  text "Layer (Reference);" at 270,137.5 h1.52
  text "Width (um);" at 305,137.5 h1.52
  text "Gap (um);" at 325,137.5 h1.52
  text "DIFF;" at 235,132.5 h1.52
  text "90ohm;" at 247.5,132.5 h1.52
  text "L1(L2), L6(L5);" at 270,132.5 h1.52
  text "250" at 305,132.5 h1.52
  text "200" at 325,132.5 h1.52
  text "DIFF;" at 235,130 h1.52
  text "90ohm;" at 247.5,130 h1.52
  text "L3(L2,L4)" at 270,130 h1.52
  text "200" at 305,130 h1.52
  text "250" at 325,130 h1.52
  text "DIFF;" at 235,125 h1.52
  text "100ohm;" at 247.5,125 h1.52
  text "L1(L2), L6(L5);" at 270,125 h1.52
  text "250" at 305,125 h1.52
  text "400" at 325,125 h1.52
  text "DIFF;" at 235,122.5 h1.52
  text "100ohm;" at 247.5,122.5 h1.52
  text "L3(L2,L4)" at 270,122.5 h1.52
  text "200" at 305,122.5 h1.52
  text "500" at 325,122.5 h1.52
  text "SE;" at 235,117.5 h1.52
  text "55ohm;" at 247.5,117.5 h1.52
  text "L1(L2), L6(L5);" at 270,117.5 h1.52
  text "250" at 305,117.5 h1.52
  text "SE;" at 235,115 h1.52
  text "55ohm;" at 247.5,115 h1.52
  text "L3(L2,L4)" at 270,115 h1.52
  text "200" at 305,115 h1.52
  text "3. FINISHED PANEL THICKNESS IS NOT CRITICAL: TO BE APPROXIMATELY 1.6mm" at 230,110 h1.52
  text "4. BOARD FINISH: IMMERSION Au/ELECTROLESS Ni; 0.05-0.12 um GOLD; 3-6um NICKEL" at 230,105 h1.52
  text "5. SOLDER RESIST: APPLY TO BOTH SIDES COLOUR - RED" at 230,100 h1.52
  text "6. COMPONENT IDENT: COLOUR TO BE WHITE" at 230,95 h1.52
  text "7. PANELIZE THE BOARD (2PCS PER PANEL). PLACE FIDUCIALS ON THE PANEL STRIPS AS FOLLOWS:" at 230,90 h1.52
  text "- FIDUCIAL DIAMTER 1-1.5MM, SOLDER MASK OPENING AT LEAST 1MM GREATER THAN FIDUCIAL" at 235,87.5 h1.52
  text "- MINIMUM 4MM DISTANCE FROM THE PANEL EDGE" at 235,85 h1.52
  text "- 3 FIDUCIALS SHOULD LIE ON TWO LINES THAT INTERSECT AT A RIGHT ANGLE" at 235,82.5 h1.52
  text "- PLACE ONE FIDUCIAL INTO EACH PANEL CORNER (FOUR ON THE TOP AND FOUR ON THE BOTTOM LAYER)" at 235,80 h1.52
  text "FREE FOR PERSONAL" at 27.5,77.5 h5
  text "Layer Stack Up Detail for: iMX6 Rex Development Baseboard V1I1_PCB.PcbDoc" at 231.524,66.75 h1.6
  text "Layer" at 231.524,60.56 h1.6
  text "Gerber" at 276.629,60.56 h1.6
  text "Copper" at 299.818,60.56 h1.6
  text "Dielectric" at 360.619,60.56 h1.6
  text "Name" at 231.524,57.36 h1.6
  text "Document" at 276.629,57.36 h1.6
  text "Thickness" at 299.818,57.36 h1.6
  text "Height" at 360.619,57.36 h1.6
  text "AND COMMERCIAL USE" at 25,52.5 h5
  text "Top Solder Mask" at 231.524,52.193 h2.25
  text "(.GTS)" at 276.629,52.193 h2.25
  text "L1" at 231.524,44.578 h2.25
  text "(.GTL)" at 276.629,44.578 h2.25
  text "0.018mm + 0.018mm plating" at 299.818,44.578 h2.25
  text "0.1725mm" at 360.619,40.77 h2.25
  text "L2" at 231.524,36.963 h2.25
  text "(.GP1)" at 276.629,36.963 h2.25
  text "0.018mm" at 299.818,36.963 h2.25
  text "0.196mm" at 360.619,33.155 h2.25
  text "L3" at 231.524,29.348 h2.25
  text "(.G1)" at 276.629,29.348 h2.25
  text "0.018mm" at 299.818,29.348 h2.25
  text "READ THE LICENCE" at 29.5,28 h5
  text "0.697mm" at 360.619,25.54 h2.25
  text "L4 (PWR)" at 231.524,21.733 h2.25
  text "(.G2)" at 276.629,21.733 h2.25
  text "0.018mm" at 299.818,21.733 h2.25
  text "0.196mm" at 360.619,17.925 h2.25
  text "L5" at 231.524,14.118 h2.25
  text "(.GP2)" at 276.629,14.118 h2.25
  text "0.018mm" at 299.818,14.118 h2.25
  text "0.1725mm" at 360.619,10.31 h2.25
  text "L6" at 231.524,6.503 h2.25
  text "(.GBL)" at 276.629,6.503 h2.25
  text "0.018mm + 0.018mm plating" at 299.818,6.503 h2.25
  text "Bottom Solder Mask" at 231.524,-1.112 h2.25
  text "(.GBS)" at 276.629,-1.112 h2.25
  text "iMX6 Rex Development BB" at 7.5,-20 h3
  text ".VersionRevision" at 80,-20 h3
  text "Copyright FEDEVEL 2013" at 7.5,-27.5 h1.52
  text "Designed by FEDEVEL" at 47.5,-27.5 h1.52
  text "www.fedevel.com" at 47.5,-30 h1.52
  text "Contact:" at 7.5,-37.5 h1.52
  text "robert.feranec@fedevel.com" at 7.5,-40 h1.52
Licence:
  text "LICENCE" at 229.8,182 h1.52
  text "ORIGINAL AUTHOR: FEDEVEL 2013" at 230,177.5 h1.52
  text "WEBSITE: http://www.iMX6Rex.com" at 230,175 h1.52
  text "This is a human-readable summary of the Legal Code (read full licence at:" at 230,170 h1.52
  text "http://creativecommons.org/licenses/by/3.0/legalcode" at 230,167.5 h1.52
  text "Share - copy and redistribute the material in any medium or format" at 230,162.5 h1.52
  text "Adapt - remix, transform, and build upon the material" at 230,160 h1.52
  text "for any purpose, even commercially." at 230,157.5 h1.52
  text "The licensor cannot revoke these freedoms as long as you follow the license terms." at 230,152.5 h1.52
  text "Under the following terms:" at 230,147.5 h1.52
  text "Attribution - You must give appropriate credit, provide a link to the license, and" at 230,145 h1.52
  text "indicate if changes were made. You may do so in any reasonable manner, but not in" at 230,142.5 h1.52
  text "any way that suggests the licensor endorses you or your use." at 230,140 h1.52
  text "No additional restrictions - You may not apply legal terms or technological measures" at 230,135 h1.52
  text "that legally restrict others from doing anything the license permits." at 230,132.5 h1.52
  text "Notices:" at 230,127.5 h1.52
  text "You do not have to comply with the license for elements of the material in the public domain or where" at 230,125 h1.52
  text "your use is permitted by an applicable exception or limitation." at 230,122.5 h1.52
  text "No warranties are given. The license may not give you all of the permissions necessary for your" at 230,117.5 h1.52
  text "intended use. For example, other rights such as publicity, privacy, or moral rights may limit how you" at 230,115 h1.52
  text "use the material." at 230,112.5 h1.52
Mechanical Drawing All:
  circle w0.6: c21.5,31 r0.25
  circle w0.6: c56.5,31 r0.25
  circle w0.8: c46.5,31 r0.4
  circle w0.8: c81.5,31 r0.4
  circle w0.6: c123.65,19.1 r0.375
  circle w1: c98.55,21.72 r0.375
  circle w1: c98.55,61.88 r0.375
  circle w0.6: c52.27,53.26 r0.225
  circle w0.6: c82.67,53.26 r0.225
  circle w0.6: c82.67,71.74 r0.225
  circle w0.6: c52.27,71.74 r0.225
  circle w0.6: c123.65,64.5 r0.375
  circle w0.8: c81.1,81.3 r0.375
  circle w0.8: c46.1,81.3 r0.375
  circle w0.6: c56.9,81.3 r0.225
  circle w0.6: c21.9,81.3 r0.225
  circle w1.4: c6,86 r0.475
  circle w1.4: c6,76.85 r0.475
  circle w0.6: c16.33,61.99 r0.4
  circle w0.6: c6.53,62.26 r0.4
  circle w0.6: c6.53,45.94 r0.4
  circle w0.6: c16.33,46.21 r0.4
  circle w0.6: c130,105 r1.6
  circle w0.6: c87,88 r1.1
  circle w0.6: c52,88 r1.1
  circle w0.6: c52,23 r1.1
  circle w0.6: c87,23 r1.1
  circle w0.6: c5,105 r1.6
  circle w0.6: c5,5 r1.6
  circle w0.6: c130,5 r1.6
  circle w0.6: c67,55 r1.1
  circle w0.6: c23,87.9 r1.35
  circle w0.6: c23,22.9 r1.35
  circle w0.6: c111,27.9 r1.35
  circle w0.6: c111,87.9 r1.35
  lines w0.2: 1,5 13,5 ; 1,105 5,105 5,109 ; 2.2,64.011 2.2,65.325 ; 2.2,65 2.2,73.675 ; 5,1.275 5,5 ; 6,77 6,78.175 ; 6.53,45.94 6.53,54 ; 14,16 14,17 ; 16.33,46.21 16.33,51 ; 23,20.198 23,22.9 ; 23,88 23,91 ; 52,20.398 52,23 54.602,23 ; 52,89 52,91 ; 52.27,53.26 52.27,71.74 ; 67,52 67,55 70,55 ; 87,20 87,23 ; 87,88 87,91 ; 95.55,21.72 95.55,61.88 ; 98.55,21.72 98.55,61.88 ; 108.1,27.9 111,27.9 ; 111,3 111,87.9 ; 118,3 122,3 ; 130,1.275 130,5 ; 130,105 133.725,105
  lines w1: 0,0 0,110 135,110 135,0 0,0
  text "Mechanical Drawing All of iMX6 Rex Development Baseboard" at 222.5,154.5 h3.5 r270
  text ".VersionRevision" at 222.5,-39 h3.5 r270
Board Outline:
  the board outline again, w0.2
ASM Top:
  text "Assembly TOP of iMX6 Rex Development Baseboard" at 30,116.5 h1.52
  text ".VersionRevision" at 100.3,116.5 h1.52
  text ".VariantName" at 56.5,112.5 h1.52
ASM Bottom:
  text ".VersionRevision" at 32,116.5 h1.52
  text "Assembly BOTTOM of iMX6 Rex Development Baseboard" at 106.7,116.5 h1.52
  text ".VariantName" at 77.5,112.5 h1.52

## Dimensions
37.1,95.9 to 42.5,65 on Mechanical Drawing
37.1,68.9 to 42.5,65 on Mechanical Drawing
113,28 to 115,19 on Mechanical Drawing
0,0 to 135,0 on Mechanical Drawing
19,19 to 19,92 on Mechanical Drawing
23,23 to 113,88 on Mechanical Drawing
19,19 to 23,23 on Mechanical Drawing
0,0 to 19,19 on Mechanical Drawing
19,19 to 115,19 on Mechanical Drawing
23,90 to 111,89.25 on Mechanical Drawing
19,19 to 23,24.25 on Mechanical Drawing
0,0 to 19,19 on Mechanical Drawing
5,107 to 130,107 on Mechanical Drawing
132,5 to 132,105 on Mechanical Drawing
0,0 to 5,5 on Mechanical Drawing
5,5 to 0,0 on Mechanical Drawing
0,0 to 0,110 on Mechanical Drawing
111,87.9 to 107.5,84.5 on Mechanical Drawing
111,27.9 to 107,32.5 on Mechanical Drawing
23,22.9 to 26,27 on Mechanical Drawing
23,87.9 to 26,84.5 on Mechanical Drawing
130,5 to 127.5,10.5 on Mechanical Drawing
5,5 to 8,9 on Mechanical Drawing
5,105 to 9,102 on Mechanical Drawing
87,23 to 84,26 on Mechanical Drawing
52,23 to 55.5,26 on Mechanical Drawing
52,88 to 55.5,84.5 on Mechanical Drawing
87,88 to 85,84 on Mechanical Drawing
130,105 to 126,100.5 on Mechanical Drawing
0,0 to 13,5 on Mechanical Drawing All
0,0 to 5,5 on Mechanical Drawing All
0,0 to 17.75,2.755 on Mechanical Drawing All
0,0 to 27.75,2.755 on Mechanical Drawing All
0,0 to 37.75,2.755 on Mechanical Drawing All
0,0 to 65.2,13 on Mechanical Drawing All
0,0 to 78,6 on Mechanical Drawing All
0,0 to 89,3 on Mechanical Drawing All
0,0 to 100,3 on Mechanical Drawing All
0,0 to 111,3 on Mechanical Drawing All
0,0 to 122,3 on Mechanical Drawing All
0,0 to 14,17 on Mechanical Drawing All
16.3,39 to 0,0 on Mechanical Drawing All
0,0 to 21.5,31 on Mechanical Drawing All
0,0 to 23,22.9 on Mechanical Drawing All
0,0 to 46.5,31 on Mechanical Drawing All
0,0 to 44,15 on Mechanical Drawing All
0,0 to 52,23 on Mechanical Drawing All
0,0 to 56.5,31 on Mechanical Drawing All
0,0 to 52.27,53.26 on Mechanical Drawing All
0,0 to 67,55 on Mechanical Drawing All
0,0 to 81.5,31 on Mechanical Drawing All
0,0 to 87,23 on Mechanical Drawing All
0,0 to 95.55,21.72 on Mechanical Drawing All
0,0 to 98.55,21.72 on Mechanical Drawing All
0,0 to 123.65,19.1 on Mechanical Drawing All
0,0 to 128.1,13.1 on Mechanical Drawing All
0,0 to 129,54.5 on Mechanical Drawing All
0,0 to 131,38 on Mechanical Drawing All
0,0 to 130,5 on Mechanical Drawing All
0,0 to 82.67,71.74 on Mechanical Drawing All
0,110 to 5,105 on Mechanical Drawing All
0,110 to 6,76.85 on Mechanical Drawing All
0,110 to 15,76.5 on Mechanical Drawing All
0,110 to 16,65.5 on Mechanical Drawing All
0,110 to 21.9,81.3 on Mechanical Drawing All
0,110 to 23,87.9 on Mechanical Drawing All
0,110 to 31.656,100.882 on Mechanical Drawing All
0,110 to 37.1,69 on Mechanical Drawing All
0,110 to 46.1,81.3 on Mechanical Drawing All
52,88 to 0,110 on Mechanical Drawing All
0,110 to 56.9,81.3 on Mechanical Drawing All
0,110 to 60,97.33 on Mechanical Drawing All
0,110 to 81.1,81.3 on Mechanical Drawing All
0,110 to 72.05,99.9 on Mechanical Drawing All
0,110 to 87,88 on Mechanical Drawing All
0,110 to 99.45,104.03 on Mechanical Drawing All
0,110 to 120.95,97.75 on Mechanical Drawing All
0,110 to 130,95.5 on Mechanical Drawing All
0,110 to 117.5,68.62 on Mechanical Drawing All
0,110 to 123.2,83.4 on Mechanical Drawing All
0,110 to 123.65,64.5 on Mechanical Drawing All
0,110 to 129.5,72 on Mechanical Drawing All
0,110 to 2.2,65.325 on Mechanical Drawing All
0,110 to 6.53,62.26 on Mechanical Drawing All
0,110 to 16.33,61.99 on Mechanical Drawing All
17.75,2.755 to 0,0 on Mechanical Drawing All
0,0 to 5,5 on Mechanical Drawing All
0,0 to 44,15 on Mechanical Drawing All
0,0 to 14,17 on Mechanical Drawing All
0,0 to 16.3,39 on Mechanical Drawing All
0,0 to 6.53,45.94 on Mechanical Drawing All
0,0 to 16.33,46.21 on Mechanical Drawing All
0,0 to 16.33,61.99 on Mechanical Drawing All
0,0 to 6.53,62.26 on Mechanical Drawing All
0,0 to 16,65.5 on Mechanical Drawing All
0,0 to 16,69.2 on Mechanical Drawing All
0,0 to 16,72.9 on Mechanical Drawing All
0,0 to 2.2,73.675 on Mechanical Drawing All
0,0 to 15,76.5 on Mechanical Drawing All
0,0 to 6,76.85 on Mechanical Drawing All
0,0 to 6,86 on Mechanical Drawing All
0,0 to 15,86.66 on Mechanical Drawing All
0,0 to 60,97.33 on Mechanical Drawing All
0,0 to 37.1,69 on Mechanical Drawing All
0,0 to 31.656,100.882 on Mechanical Drawing All
0,0 to 5,105 on Mechanical Drawing All
135,0 to 130,5 on Mechanical Drawing All
135,0 to 89,3 on Mechanical Drawing All
78,6 to 135,0 on Mechanical Drawing All
128.1,13.1 to 135,0 on Mechanical Drawing All
95.55,21.72 to 135,0 on Mechanical Drawing All
123.65,19.1 to 135,0 on Mechanical Drawing All
52,23 to 0,0 on Mechanical Drawing All
21.5,31 to 0,0 on Mechanical Drawing All
111,27.9 to 135,0 on Mechanical Drawing All
135,0 to 131,27.84 on Mechanical Drawing All
135,0 to 131,32.92 on Mechanical Drawing All
135,0 to 131,38 on Mechanical Drawing All
135,0 to 52.27,53.26 on Mechanical Drawing All
67,55 to 135,0 on Mechanical Drawing All
129,54.5 to 135,0 on Mechanical Drawing All
95.55,61.88 to 135,0 on Mechanical Drawing All
123.65,64.5 to 135,0 on Mechanical Drawing All
117.5,68.62 to 135,0 on Mechanical Drawing All
52.27,71.74 to 135,0 on Mechanical Drawing All
129.5,72 to 135,0 on Mechanical Drawing All
21.9,81.3 to 135,0 on Mechanical Drawing All
123.2,83.4 to 135,0 on Mechanical Drawing All
23,87.9 to 135,0 on Mechanical Drawing All
130,95.5 to 135,0 on Mechanical Drawing All
120.95,97.75 to 135,0 on Mechanical Drawing All
72.05,99.9 to 135,0 on Mechanical Drawing All
99.45,104.03 to 135,0 on Mechanical Drawing All
130,105 to 135,0 on Mechanical Drawing All
0,0 to 0,110 on Mechanical Drawing All
0,0 to 135,0 on Mechanical Drawing All
0,0 to 24,23 on Mechanical Drawing All
65.2,13 to 0,0 on Mechanical Drawing All
130,105 to 137.5,112.5 on Mechanical Drawing All
87,88 to 91,92 on Mechanical Drawing All
52,88 to 47,91 on Mechanical Drawing All
52,23 to 50,25 on Mechanical Drawing All
87,23 to 83.696,19.696 on Mechanical Drawing All
5,105 to -5,115 on Mechanical Drawing All
5,5 to -7.5,-5 on Mechanical Drawing All
130,5 to 145,-15 on Mechanical Drawing All
67,55 to 70,57.5 on Mechanical Drawing All
23,87.9 to 25,85 on Mechanical Drawing All
23,22.9 to 40.559,40.459 on Mechanical Drawing All
111,27.9 to 115,32.5 on Mechanical Drawing All
111,87.9 to 103.629,95.271 on Mechanical Drawing All

## Text inside footprints (layer, text, board x,y; h text height)
J3: Top Overlay "Panel" at 2.3,98.8 h1.5
J4: Bottom Overlay "1" at 45.3,25.1 h1.02 r270
J5: Bottom Overlay "Out" at 24.9,47.7 h0.8; Bottom Overlay "Keep" at 25.3,49 h0.8
J7: Top Overlay "Keep" at 25.3,59.2 h0.8 r180; Top Overlay "Out" at 24.9,60.5 h0.8 r180
J9: Bottom Overlay "1" at 80.3,25.1 h1.02 r270
J10: Top Overlay "1" at 134.1,27.2 h1.02
J11: Top Overlay "1" at 134.1,37.4 h1.02
J12: Top Overlay "1" at 134.1,32.3 h1.02
J13: Top Overlay "1" at 128.67,10.106 h1.02 r90
J15: Bottom Overlay "2mm height restriction" at 107.3,21.5 h1 r180; Bottom Overlay "2mm height restriction" at 107.1,62.7 h1 r180
J16: Mechanical 1 "NOTE: Holes are big and connector" at 67.3,96 h0.5 r90; Mechanical 1 "doesnt fit on one place. Bottom" at 68.5,96 h0.5 r90; Mechanical 1 "plastic may go over the board edge" at 69.7,95.9 h0.5 r90
J17: Top Overlay "1" at 13.9,18.7 h1.02 r90
J18: Top Overlay "1" at 115.7,69.1 h1.02 r180
J19: Top Overlay "1" at 129,73.7 h1.02 r270
J20: Top Overlay "1" at 17.994,87.23 h1.02 r180
J23: Top Overlay "1" at 18,77.4 h1.02 r180
J24: Top Overlay "1" at 99.6,106.58 h0.6 r180; Top Overlay "7" at 106,106.58 h0.6 r180
J29: Bottom Overlay "Keep Out" at 57.9,8.6 h1
J30: Top Overlay "9" at 19.4,103.5 h0.6; Top Overlay "5" at 18.8,100.6 h0.6; Top Overlay "1" at 33.1,100.7 h0.6; Top Overlay "6" at 32.3,103.5 h0.6
J31: Top Overlay "1" at 125.27,53.97 h1.02
J33: Top Overlay "1" at 77.47,9.73 h1.02 r270
J34: Top Overlay "1" at 65.73,9.27 h1.02 r90
J35: Top Overlay "1" at 120.2,82.9 h1.02
J36: Top Overlay "1" at 43.3,19.3 h1.02 r270
J38: Top Overlay "1" at 124.9,95.5 h1.02
J39: Top Overlay "Keep Out" at 37.6,39 h1
J41: Top Overlay "1" at 12,15 h1.02 r180; Top Overlay "Pattern Prohibited" at 6.2,38.6 h1.52 r270
JP1: Top Overlay "1" at 16.1,74.86 h0.93 r270
JP2: Top Overlay "1" at 16.1,71.2 h1.02 r270
JP3: Top Overlay "1" at 16.1,67.5 h1.02 r270
Q2: Top Overlay "1" at 109.6,80 h1.02 r90
Q3: Top Overlay "1" at 109.6,70.6 h1.02 r90
T1: Bottom Overlay "1" at 106.7,74.5 h1.02 r270
U9: Bottom Overlay "1" at 3.1,16.3 h1.02 r180
U10: Top Overlay "1" at 114.3,60 h1.02 r90
U11: Top Overlay "1" at 73.3,74.8 h1.02
U12: Top Overlay "1" at 25.5,65.2 h1.02 r90
U17: Bottom Overlay "1" at 34.6,75.2 h1.02 r270